# Altium PCB QKD-LD-002.PcbDoc
Units mm, origin at the board's own origin, x right, y up, seen from the top; angles counter-clockwise.
Board outline 56.64 x 46.48 mm, 4 copper layers (Top Layer 1, GND, 5V0, Bottom Layer 1), stack 1.527 mm thick; 43 components, 26 nets, 130 pads, 340 vias.
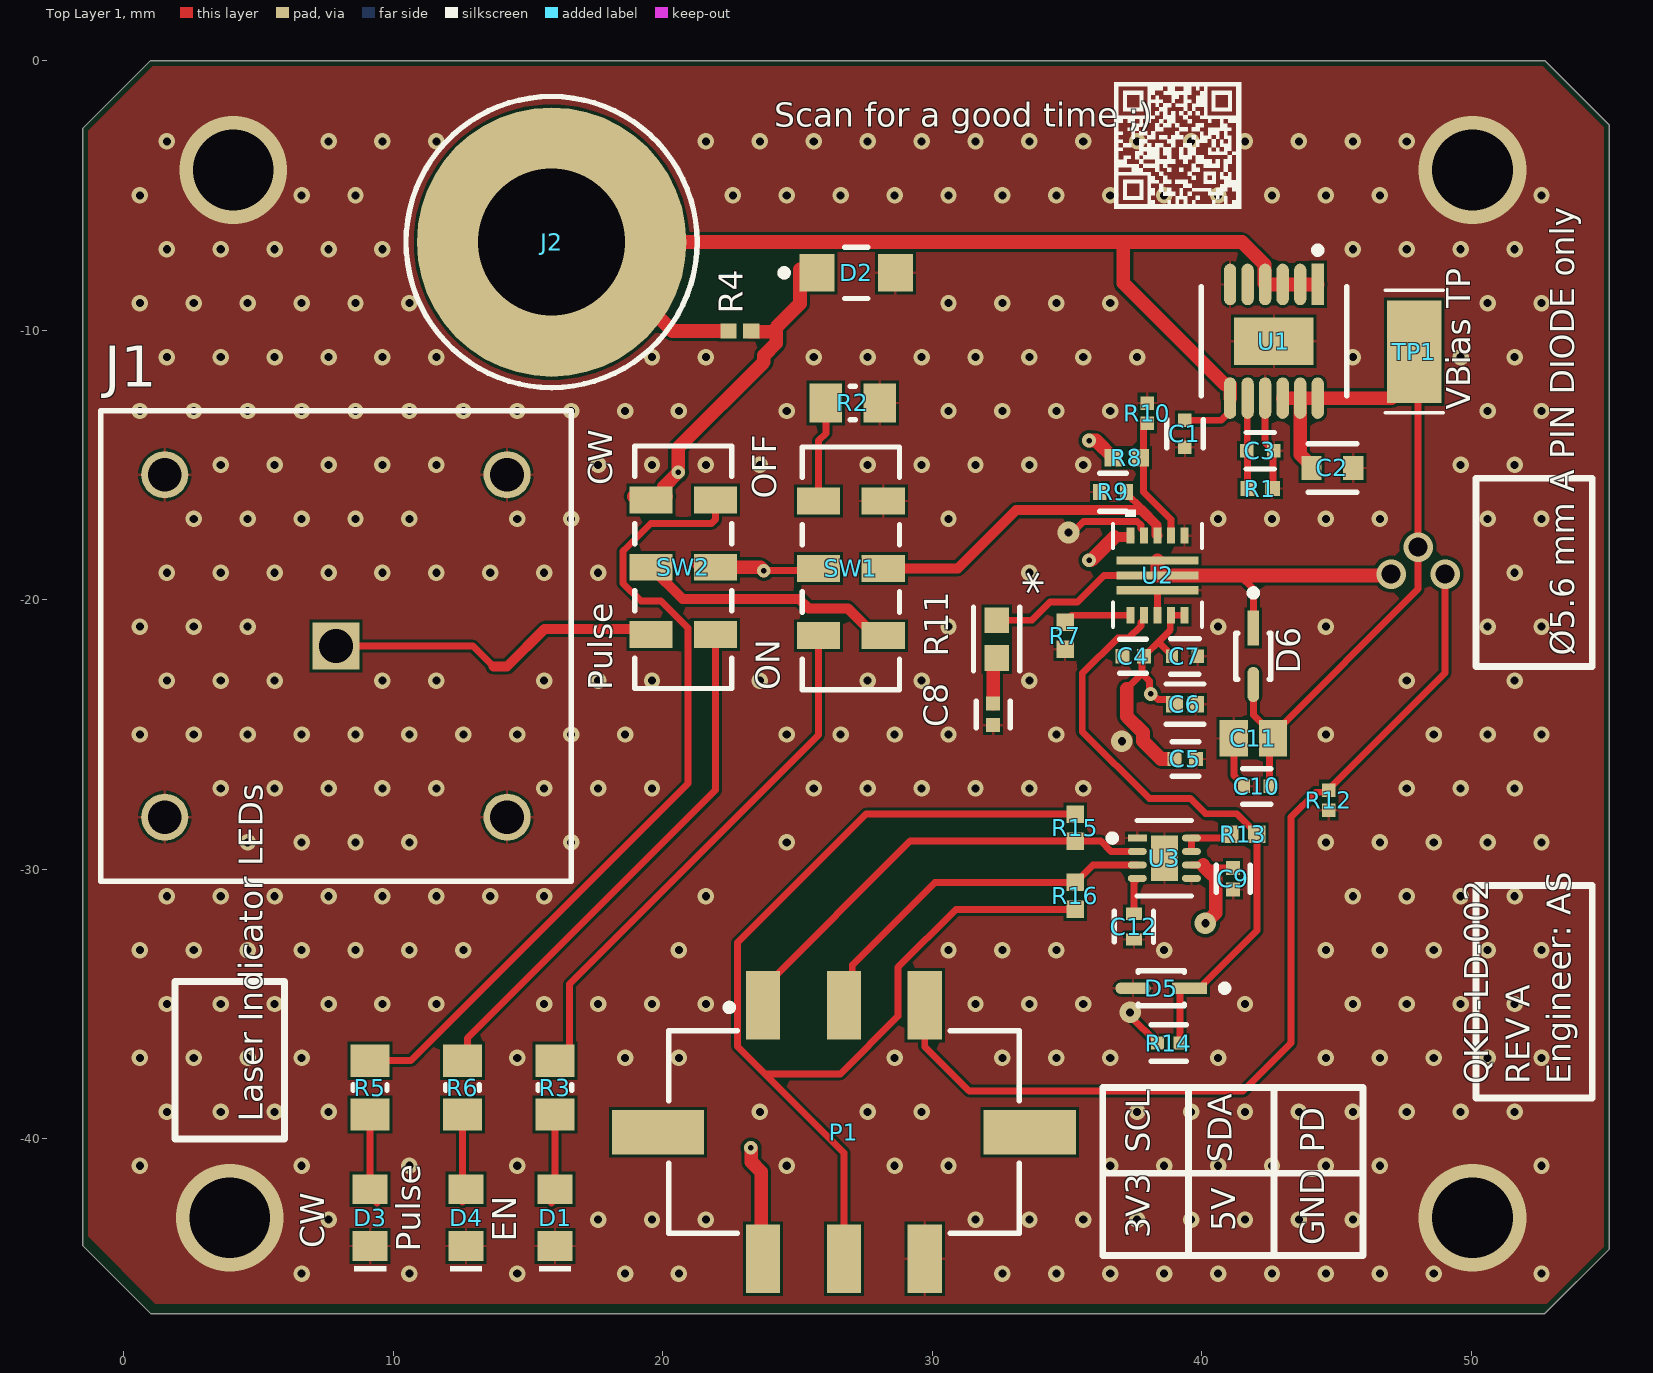
[diagram p0: Top Layer 1 view]
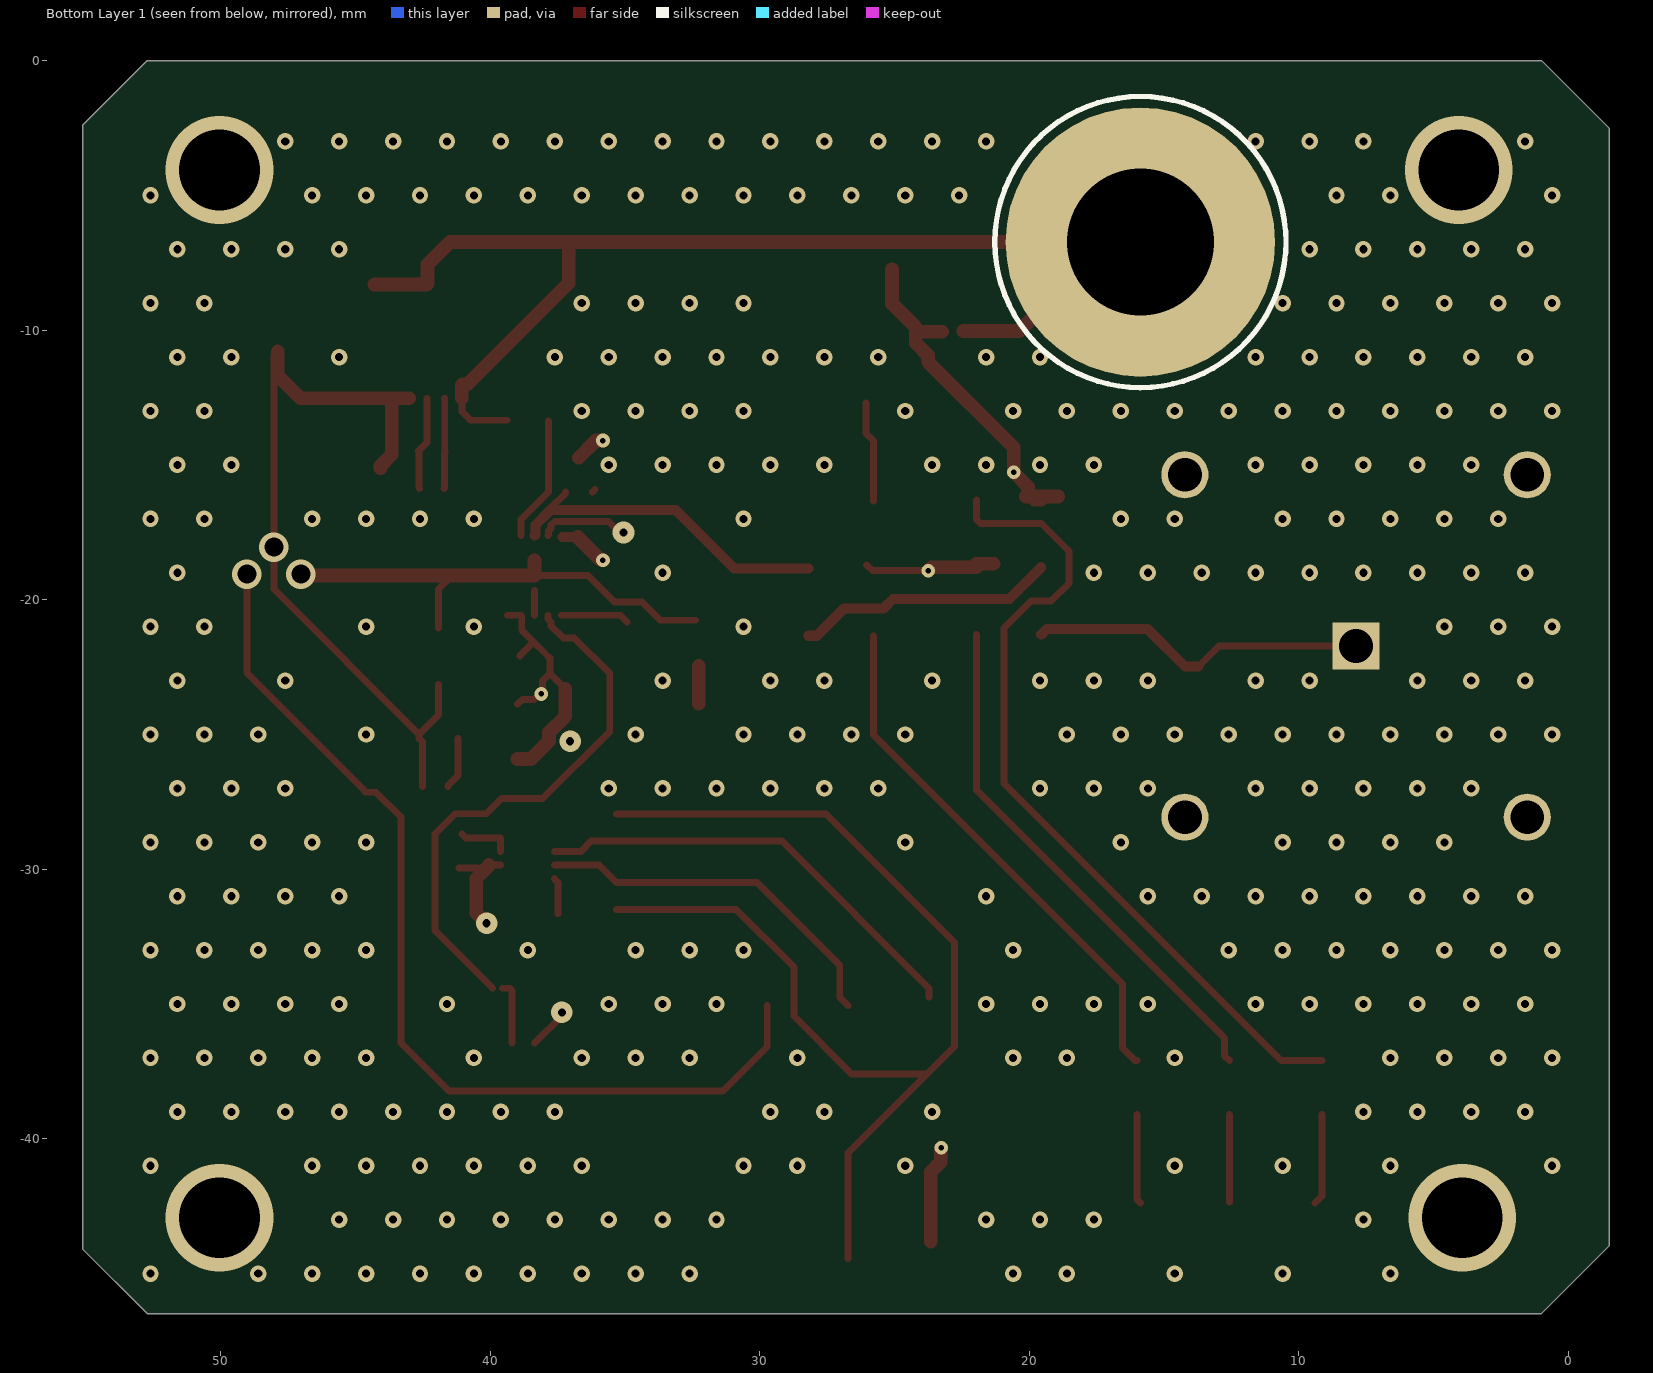
[diagram p1: Bottom Layer 1 view, seen from below]
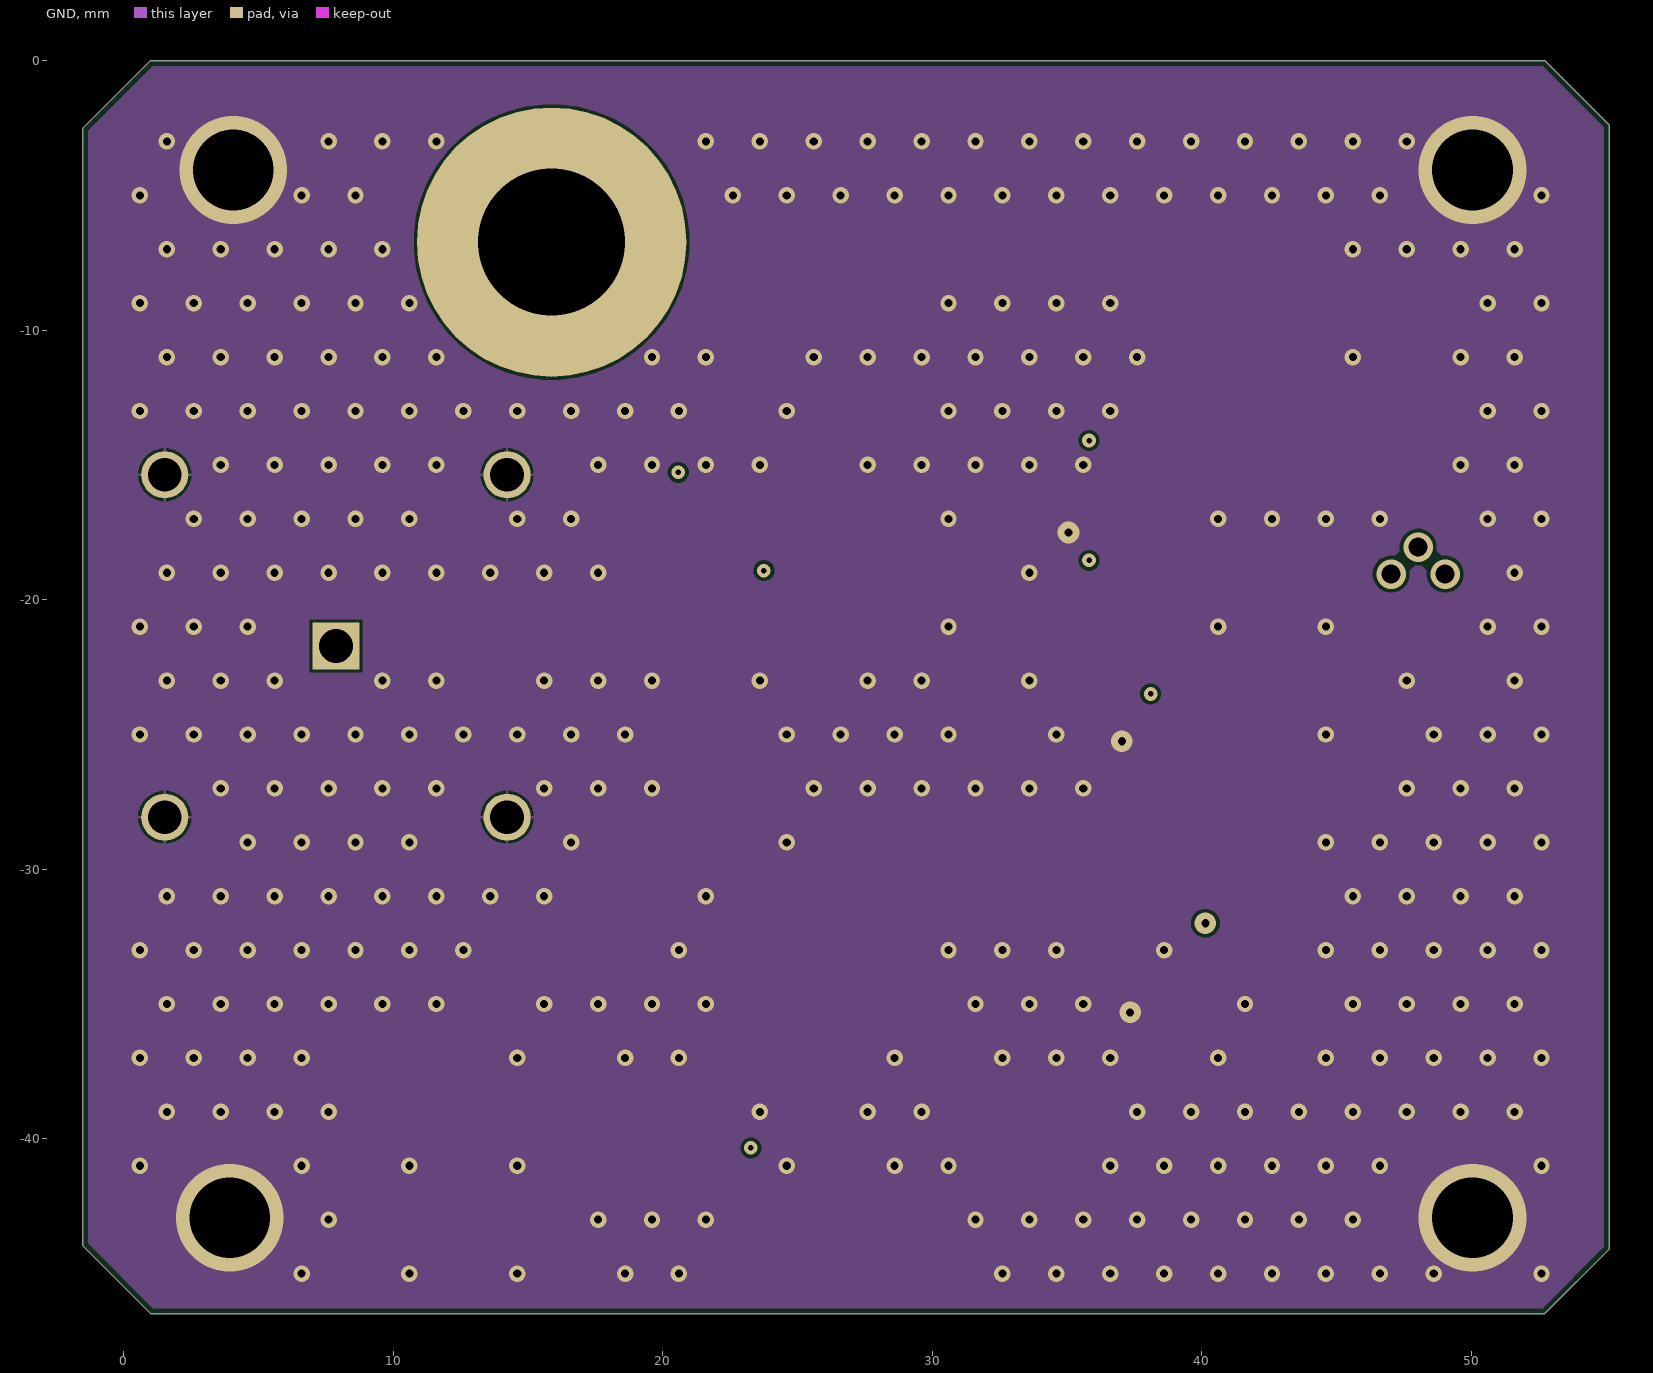
[diagram p2: GND]
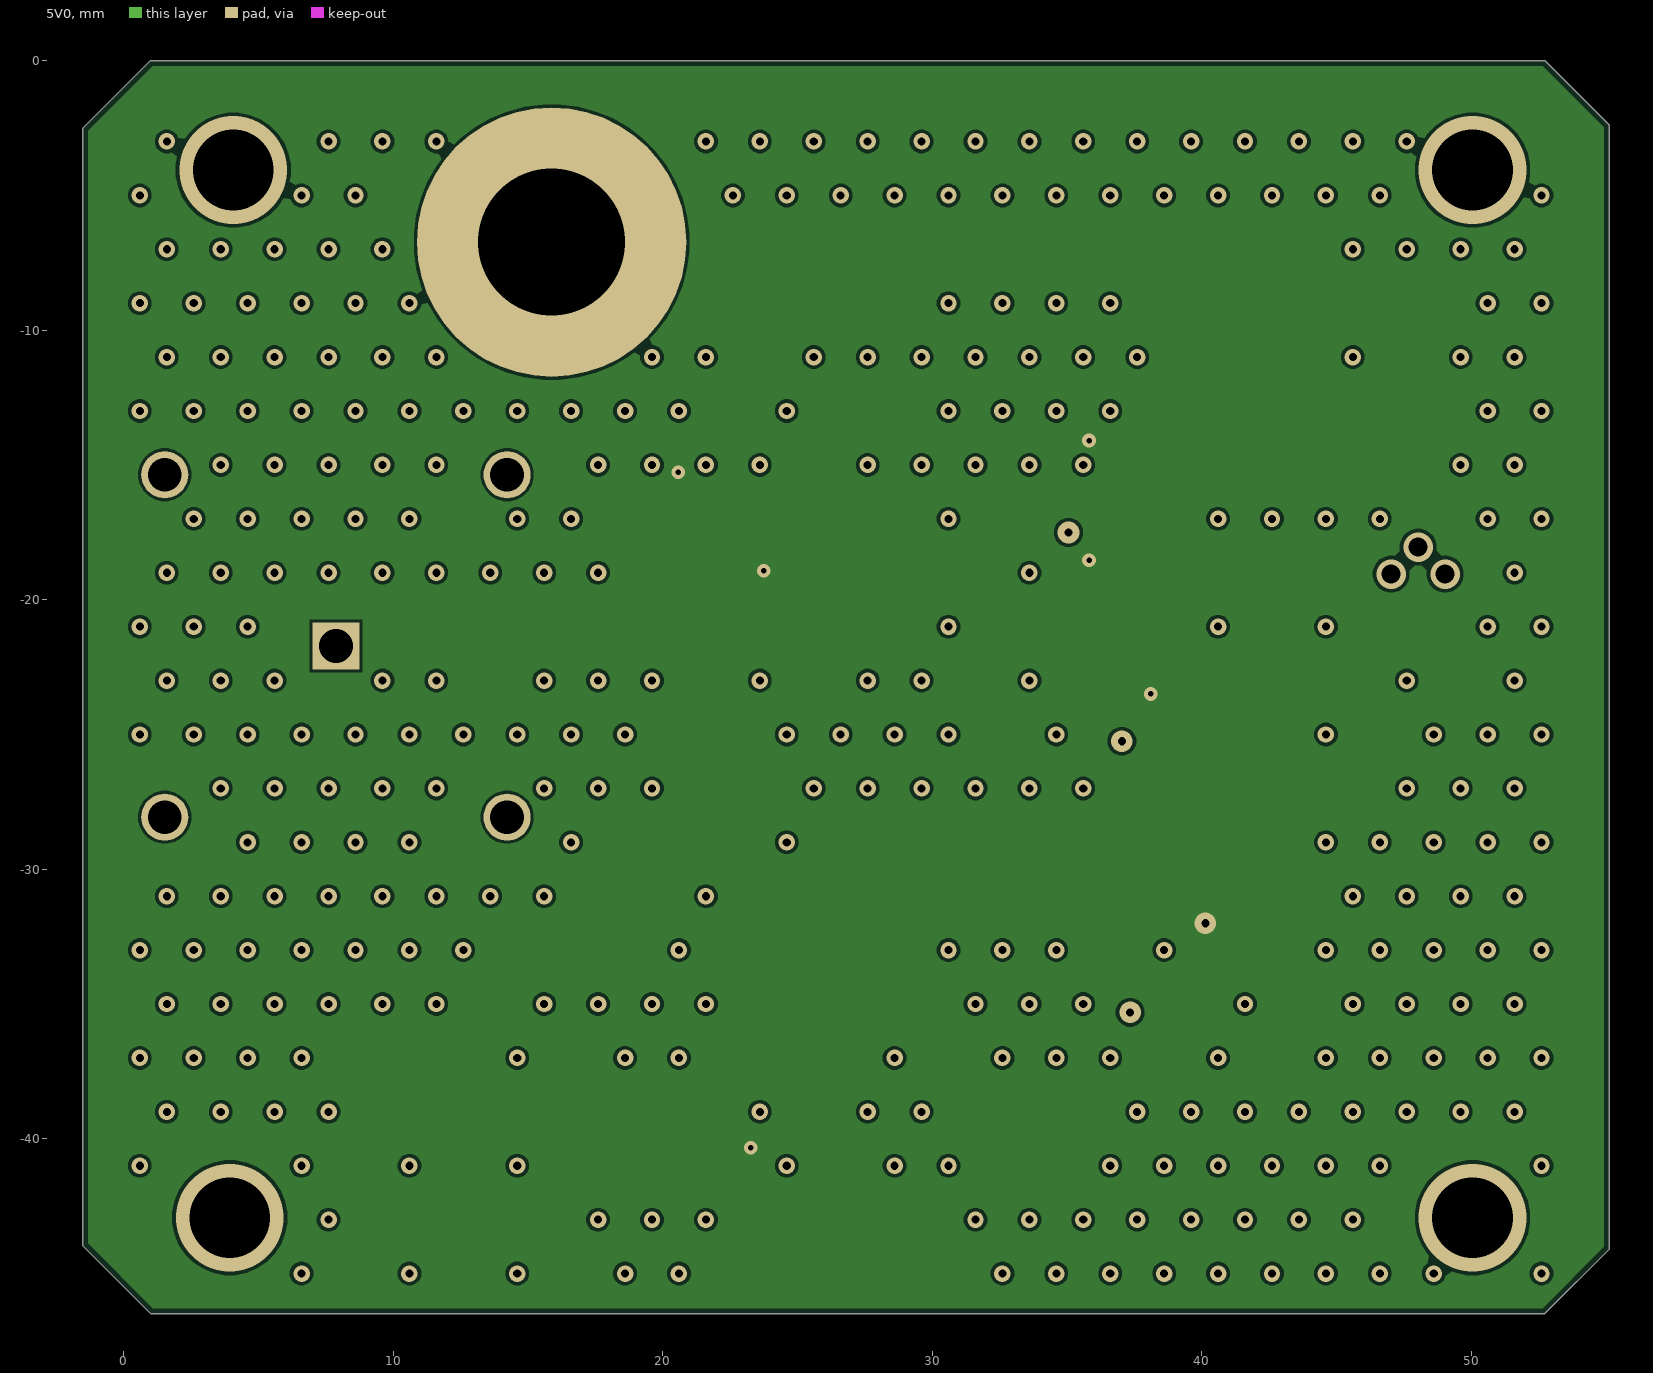
[diagram p3: 5V0]
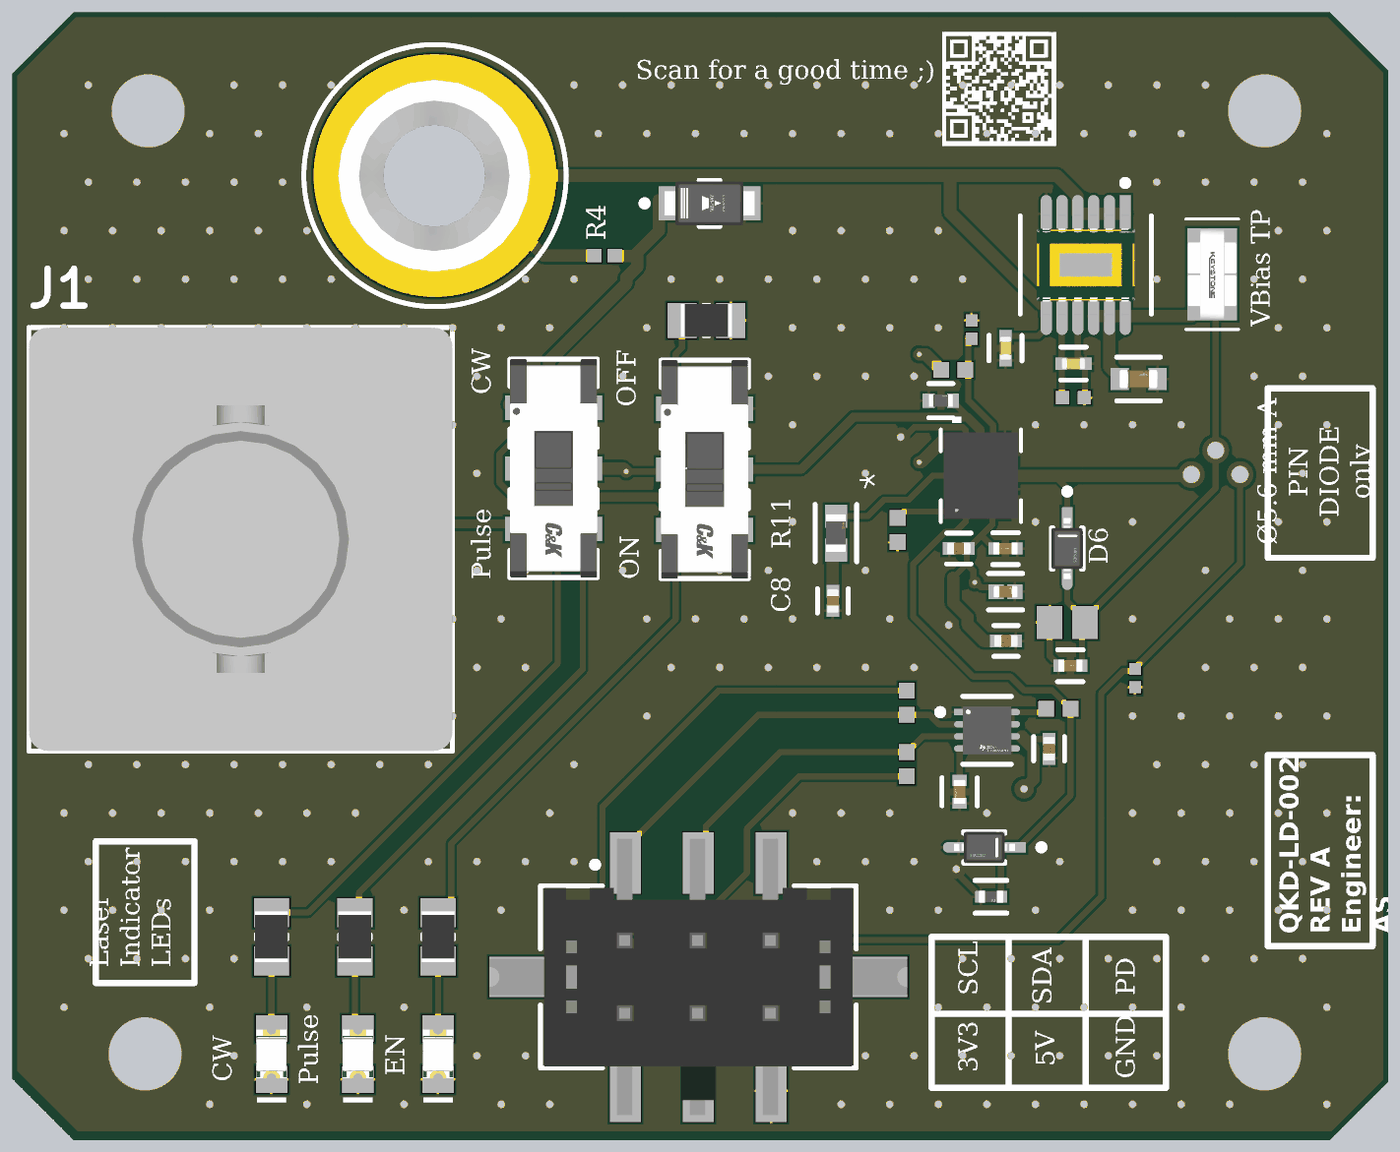
[diagram p4: 3D render of the assembled board from above, using the file's embedded part models]

## Layer stack, top to bottom
Top Solder: solder mask 0.0102, Solder Resist, Dk 3.5
Top Layer 1: signal copper 0.0175
Dielectric 2: prepreg 0.196, PP-006, Dk 4.1
GND: signal copper 0.035
Dielectric 1: dielectric 1.03, FR-4, Dk 4.8
5V0: signal copper 0.035
Dielectric 3: prepreg 0.196, PP-006, Dk 4.1
Bottom Layer 1: signal copper 0.0175
Bottom Solder: solder mask 0.0102, Solder Resist, Dk 3.5

## Board outline
-1.524,-43.958 -1.524,-2.524 1,0 52.721,0 55.118,-2.397 55.118,-44.085 52.721,-46.482 1,-46.482

## Design rules (kind name [scope] priority, off if disabled: settings)
BoardOutlineClearance [All] p1: gap=0.2 ignorepadtopadclearanceinfootprint=FALSE
Clearance [All] p1: gap=0.102 ignorepadtopadclearanceinfootprint=TRUE except(0.127: Arc-Via Track-Via SMDPad-Via THPad-Via Via-Via Via-Fill Via-Poly Via-Region Via-Text; 0.254: Arc-Hole Track-Hole SMDPad-Hole THPad-Hole Via-Hole Fill-Hole Poly-Hole Region-Hole Text-Hole)
ComponentClearance [All] p1: gap=0.102 collisioncheckmode=3 verticalgap=0.102 showdistances=TRUE
DiffPairsRouting [All] p1: maxlimit=0.102 minlimit=0.102 mostfreqgap=0.102 toplayer_minwidth=0.102 toplayer_maxwidth=1816.048 toplayer_prefwidth=0.102 midlayer1_minwidth=0.102 midlayer1_maxwidth=1816.048 midlayer1_prefwidth=0.102 midlayer2_minwidth=0.102 midlayer2_maxwidth=1816.048 midlayer2_prefwidth=0.102 bottomlayer_minwidth=0.102 bottomlayer_maxwidth=1816.048 bottomlayer_prefwidth=0.102 maxuncoupledlength=12.7
Height [All] p1: minheight=0 maxheight=1816.048 prefheight=12.7
HoleSize [All] p1: absolutevalues=TRUE maxlimit=6.3 minlimit=0.2 maxpercent=80.000 minpercent=20.000
HoleToHoleClearance [All] p1: gap=0.254 allowstackedmicrovias=FALSE
MinimumAnnularRing [All] p1: minimumring=0.152
MinimumSolderMaskSliver [All] p1: minsoldermaskwidth=0.152
NetAntennae NetAntennae_1 [Not (InNet('PD READ') Or InNet('IOUT') Or InNet('VBIAS'))] p1: netantennaetolerance=0
PlaneClearance [All] p1: clearance=0.102
PlaneConnect PlaneConnectPowerPads [InPadClass('PowerPads')] p1: planeconnectstyle=Direct reliefexpansion=0.508 reliefentries=4 reliefconductorwidth=0.254 reliefairgap=0.254
PlaneConnect [InNet('+5V0')] p2: pad.planeconnectstyle=Relief pad.reliefexpansion=0.3 pad.reliefentries=4 pad.reliefconductorwidth=0.102 pad.reliefairgap=0.102 via.planeconnectstyle=Direct via.reliefexpansion=0.3 via.reliefentries=4 via.reliefconductorwidth=0.127 via.reliefairgap=0.127
PlaneConnect PlaneConnect_1 [All] p3: pad.planeconnectstyle=Relief pad.reliefexpansion=0.3 pad.reliefentries=4 pad.reliefconductorwidth=0.102 pad.reliefairgap=0.102 via.planeconnectstyle=Direct via.reliefexpansion=0.3 via.reliefentries=4 via.reliefconductorwidth=0.127 via.reliefairgap=0.127
PolygonConnect PolygonConnectPowerPads [All vs (InPadClass('PowerPads'))] p1: connectstyle=Direct reliefconductorwidth=0.254 reliefentries=4 polygonreliefangle="90 Angle" airgapwidth=0.254
PolygonConnect [All] p2: thpad.connectstyle=Relief thpad.reliefconductorwidth=0.102 thpad.reliefentries=4 thpad.polygonreliefangle="90 Angle" thpad.airgapwidth=0.102 smdpad.connectstyle=Relief smdpad.reliefconductorwidth=0.102 smdpad.reliefentries=4 smdpad.polygonreliefangle="90 Angle" smdpad.airgapwidth=0.102 via.connectstyle=Direct via.reliefconductorwidth=0.127 via.reliefentries=4 via.polygonreliefangle="90 Angle" via.airgapwidth=0.127
RoutingVias [All] p1: holewidth=0.2 width=0.45 viastyle="Through Hole" minholewidth=0.2 minwidth=0.45 maxholewidth=6.3 maxwidth=6.55
SilkToSilkClearance [All] p1: silktosilkclearance=0.127
SilkToSolderMaskClearance [IsPad] p1: minsilkscreentomaskgap=0.127 clearancetoexposedcopper=TRUE
SolderMaskExpansion [All] p1: expansion=0.051 istentingtop=FALSE
SupplyNets "Schematic Supply Nets_1" [InNet('GND')] p1: voltage=0.000
SupplyNets "Schematic Supply Nets" [InNet('VBIAS')] p2: voltage=0.000
UnRoutedNet [Not InComponent('J2') and Not (IsVia)] p1: checkbadconnections=TRUE
Width Width_10mil [All] p1: maxlimit=25.4 minlimit=0.254 preferedwidth=0.254 minimp=50.000000 maximp=50.000000 favimp=50.000000
Width Width_6mil [All] p2: maxlimit=25.4 minlimit=0.152 preferedwidth=0.152 minimp=50.000000 maximp=50.000000 favimp=50.000000
Width Power_20mil [InNet('+5V0')] p3: maxlimit=25.4 minlimit=0.508 preferedwidth=0.508 minimp=50.000000 maximp=50.000000 favimp=50.000000
Width Power_20mil_1 [InNet('GND')] p4: maxlimit=25.4 minlimit=0.508 preferedwidth=0.508 minimp=50.000000 maximp=50.000000 favimp=50.000000
Width Power_12mil [InNet('IOUT')] p5: maxlimit=25.4 minlimit=0.305 preferedwidth=0.305 minimp=50.000000 maximp=50.000000 favimp=50.000000
Width Width_4mil [All] p6: maxlimit=25.4 minlimit=0.102 preferedwidth=0.102 minimp=50.000000 maximp=50.000000 favimp=50.000000
18 further rules are at their usual default settings.

## Classes and differential pairs
component class "Power Regulation and Interfaces": C1 C2 C3 D1 D2 D3 D4 J1 J2 P1 R1 R2 R3 R4 R5 R6 SW1 SW2 TP1 U1
component class "Laser Driver": C4 C5 C6 C7 C8 C9 C10 C11 C12 D5 D6 R7 R8 R9 R10 R11 R12 R13 R14 R15 R16 U2 U3

## Components (designator, comment, footprint, x,y, rotation, side; value= is the part's Value field where it differs from the comment)
C1 "4.7u" FP-CC0402-MFG 39.37,-13.843 r270 top value="4.7 uF"
C2 "47 uF" FP-GRM188-0_2-MFG 44.844,-15.113 r0 top
C3 "4.7u" FP-CC0402-MFG 42.164,-14.478 r180 top value="4.7 uF"
C4 "100nF" FP-C0402-BB-MFG 37.446,-22.098 r0 top value="0.10 μF"
C5 "100nF" FP-C0402-BB-MFG 39.389,-25.908 r180 top value="0.10 μF"
C6 "10 uF" FP-GRM155-0_2-IPC_C 39.37,-23.876 r0 top
C7 "1uF" FP-0402-L_1_0_0_05-W_0_5-MFG 39.37,-22.098 r0 top
C8 "100 pF" FP-C0402-BB-MFG 32.258,-24.257 r270 top
C9 "100nF" FP-C0402-BB-MFG 41.161,-30.349 r270 top value="0.10 μF"
C10 "1uF" FP-0402-L_1_0_0_05-W_0_5-MFG 42.037,-26.924 r0 top
C11 "100nF" CAPC2013X145X50LL20T20 41.91,-25.146 r0 top
C12 "2.2u" FP-GRM155-0_15-MFG 37.478,-32.127 r270 top
D1 "LASER ON" WL-SMCW_0805_150080xx75000 16.002,-42.926 r90 top
D2 "BZD27C5V6P-E3-08" FP-S8-V-3915_01-001-MFG 27.178,-7.874 r180 top
D3 "CW" WL-SMCW_0805_150080xx75000 9.144,-42.926 r90 top
D4 "PULSE" WL-SMCW_0805_150080xx75000 12.7,-42.926 r90 top
D5 "2.4V" FP-SOD323-IPC_B 38.494,-34.413 r180 top
D6 "D22V0S1U2WS-7" FP-SOD323-IPC_B 41.91,-22.098 r270 top
J1 "5227699-2" TECO-5227699-2_V 7.874,-21.717 r0 top
J2 "575-4" KSTN-575-4 15.875,-6.731 r0 top
P1 "662006231822" 662006231822 26.718,-39.752 r180 top
R1 "49.9k" RESC1005X40X25NL05T05 42.164,-15.875 r180 top
R2 "1k" RESC2013X60X35ML10T20 27.051,-12.7 r0 top
R3 "1k" RESC2013X60X35ML10T20 16.002,-38.1 r270 top
R4 "0" RESC1005X40X25NL05T10 22.86,-10.033 r0 top
R5 "1k" RESC2013X60X35ML10T20 9.144,-38.1 r270 top
R6 "1k" RESC2013X60X35ML10T20 12.573,-38.1 r270 top
R7 "20k" RESC1005X40X25ML05T05 34.925,-21.336 r90 top
R8 "20k" RESC1005X40X25ML05T05 37.211,-14.732 r180 top
R9 "50" FP-RT0402-0_35-MFG 36.703,-16.002 r0 top
R10 "10k" RESC1005X40X25LL10T10 37.973,-13.081 r270 top
R11 "10" FP-TFCR0603-IPC_B 32.385,-21.463 r270 top
R12 "10k" RESC1005X40X25LL10T10 44.704,-27.438 r90 top
R13 "20k" RESC1005X40X25ML05T05 41.542,-28.698 r0 top
R14 "1.8k" FP-RN73R1E-IPC_C 38.768,-36.449 r0 top
R15 "20k" RESC1005X40X25ML05T05 35.306,-28.456 r90 top
R16 "20k" RESC1005X40X25ML05T05 35.306,-30.988 r270 top
SW1 "JS202011JCQN" FP-JS202011JCQN-MFG 26.981,-18.836 r270 top
SW2 "JS202011JCQN" FP-JS202011JCQN-MFG 20.758,-18.796 r270 top
TP1 "5019" 5019_MFG 47.879,-10.795 r270 top
U1 "LT3045EMSE#TRPBF" FP-MSE-12-05-08-1666-IPC_B 42.672,-10.414 r270 top
U2 "LMH13000RQER" XLMH13000RQER.A_WQFN-HR_TXI_TEX 38.354,-19.099 r90 top
U3 "DAC53701DSGR" FP-DSG0008A-IPC_B 38.608,-29.591 r0 top

## Footprints (in the part's own frame and the unit in brackets; to place one, negate y for a bottom-side part, rotate by r counter-clockwise, add the part's x,y. Pads: shape width x height; smd on the part's side, far side on the other; paste and mask are expansions set on the pad)
5019_MFG [mm] "Recommended Land Pattern"
  rect 3.8x2.03 smd paste+0 mask+0: 1(0,0)
  silkscreen extent -2.27,-1.08 2.27,1.08, body extent -1.91,-1.01 1.91,1.01, height 2.42
662006231822 [mm] "3.00mm SMT Male Dual Row Vertical Header with SMT Solder Tab, 6p"
  rect 1.27x2.54 smd: 1(3,-4.7) 2(0,-4.7) 3(-3,-4.7) 4(3,4.7) 5(0,4.7) 6(-3,4.7)
  rect 3.43x1.65 smd: MP1(-6.895,0) MP2(6.895,0)
  silkscreen extent -6.5,-4.75 6.5,3.76, body extent -8.6,-5.7 8.6,5.7, height 9.93
CAPC2013X145X50LL20T20 [mm] "Chip Capacitor, 2-Leads, Body 2.00x1.25mm, IPC High Density"
  rect 1.05x1.35 smd: 1(-0.725,0) 2(0.725,0)
  body extent -1.1,-0.72 1.1,0.72, height 1.45
FP-0402-L_1_0_0_05-W_0_5-MFG [mm]
  rect 0.45x0.5 smd paste+0 mask+0: 1(-0.475,0) 2(0.475,0)
  silkscreen extent -0.53,-0.66 0.53,0.65, body extent -0.8,-0.38 0.8,0.38, height 0.25
FP-C0402-BB-MFG [mm]
  rect 0.52x0.52 smd paste+0 mask+0: 1(-0.4,0) 2(0.4,0)
  silkscreen extent -0.5,-0.64 0.5,0.64, body extent -0.8,-0.4 0.8,0.4, height 0.25
FP-CC0402-MFG [mm]
  rect 0.5x0.5 smd paste+0 mask+0: 1(-0.5,0) 2(0.5,0)
  silkscreen extent -0.53,-0.68 0.53,0.67, body extent -0.87,-0.48 0.87,0.48, height 0.25
FP-DSG0008A-IPC_B [mm]
  rect 0.706x0.257 smd paste+0 mask+0: 1(-1.003,0.75)
  rrect100% 0.706x0.257 smd paste+0 mask+0: 2(-1.003,0.25) 3(-1.003,-0.25) 4(-1.003,-0.75) 5(1.003,-0.75) 6(1.003,-0.25) 7(1.003,0.25) 8(1.003,0.75)
  rect 1x1.7 smd paste-1000 mask+0: 9(0,0)
  silkscreen extent -2.06,-1.4 1,1.4, body extent -1.61,-1.25 1.61,1.25, height 0.25
FP-GRM155-0_2-IPC_C [mm]
  rect 0.628x0.606 smd paste+0 mask+0: 1(-0.389,0) 2(0.389,0)
  silkscreen extent -0.7,-0.75 0.7,0.75, body extent -0.8,-0.45 0.8,0.45, height 0.25
FP-GRM155-0_15-MFG [mm]
  rect 0.45x0.6 smd paste+0 mask+0: 1(-0.475,0) 2(0.475,0)
  silkscreen extent -0.58,-0.73 0.57,0.73, body extent -0.8,-0.43 0.8,0.43, height 0.25
FP-GRM188-0_2-MFG [mm]
  rect 0.75x0.9 smd paste+0 mask+0: 1(-0.775,0) 2(0.775,0)
  silkscreen extent -0.9,-0.9 0.9,0.9, body extent -1.25,-0.6 1.25,0.6, height 0.25
FP-JS202011JCQN-MFG [mm]
  rect 1x1.6 smd paste+0 mask+0: 1(-2.5,-1.2) 2(0,-1.2) 3(2.5,-1.2) 5(-2.5,1.2) 6(0,1.2) 7(2.5,1.2)
  silkscreen extent -4.5,-1.8 4.5,1.8, body extent -4.6,-2.1 4.6,2.1, height 0.25
FP-MSE-12-05-08-1666-IPC_B [mm]
  rect 1.54x0.455 smd paste+0 mask+0: 1(-2.11,1.625)
  rrect100% 1.54x0.455 smd paste+0 mask+0: 2(-2.11,0.975) 3(-2.11,0.325) 4(-2.11,-0.325) 5(-2.11,-0.975) 6(-2.11,-1.625) 7(2.11,-1.625) 8(2.11,-0.975) 9(2.11,-0.325) 10(2.11,0.325) 11(2.11,0.975) 12(2.11,1.625)
  rect 1.753x2.947 smd paste-1000 mask+0: 13(0,0)
  silkscreen extent -3.5,-2.7 2.02,2.7, body extent -3.13,-2.27 3.13,2.27, height 0.25
FP-RN73R1E-IPC_C [mm]
  rect 0.488x0.472 smd paste+0 mask+0: 1(-0.414,0) 2(0.414,0)
  silkscreen extent -0.66,-0.67 0.66,0.67, body extent -0.76,-0.38 0.76,0.38, height 0.25
FP-RT0402-0_35-MFG [mm]
  rect 0.5x0.6 smd paste+0 mask+0: 1(-0.5,0) 2(0.5,0)
  silkscreen extent -0.5,-0.71 0.5,0.7, body extent -0.85,-0.4 0.85,0.4, height 0.25
FP-S8-V-3915_01-001-MFG [mm]
  rect 1.3x1.4 smd paste+0 mask+0: 1(-1.45,0) 2(1.45,0)
  silkscreen extent -0.42,-0.95 2.8,0.95, body extent -2.2,-1.05 2.2,1.05, height 0.25
FP-SOD323-IPC_B [mm]
  rect 1.306x0.432 smd paste+0 mask+0: 1(-1.05,0)
  rrect100% 1.306x0.432 smd paste+0 mask+0: 2(1.05,0)
  silkscreen extent -2.48,-0.65 0.85,0.65, body extent -1.95,-0.9 1.95,0.9, height 0.25
FP-TFCR0603-IPC_B [mm]
  rect 0.958x0.912 smd paste+0 mask+0: 1(-0.702,0) 2(0.702,0)
  silkscreen extent -1.18,-0.86 1.18,0.86, body extent -1.43,-0.71 1.43,0.71, height 0.25
KSTN-575-4 [mm] "Banana Jack, Non-Insulated, Dia 7.92mm"
  round 10 hole 5.45: 1(0,0)
  silkscreen extent -5.4,-5.4 5.4,5.4, body extent -3.98,-3.96 3.92,3.94, height 2.36
RESC1005X40X25LL10T10 [mm] "Chip Resistor, 2-Leads, Body 1.00x0.50mm, IPC High Density"
  rect 0.5x0.5 smd: 1(-0.375,0) 2(0.375,0)
  body extent -0.55,-0.3 0.55,0.3, height 0.4
RESC1005X40X25ML05T05 [mm] "Chip Resistor, 2-Leads, Body 1.00x0.50mm, IPC Low Density"
  rect 0.65x0.65 smd: 1(-0.5,0) 2(0.5,0)
  body extent -0.53,-0.27 0.53,0.28, height 0.4
RESC1005X40X25NL05T05 [mm] "Chip Resistor, 2-Leads, Body 1.00x0.50mm, IPC Medium Density"
  rect 0.55x0.55 smd: 1(-0.45,0) 2(0.45,0)
  body extent -0.53,-0.27 0.53,0.28, height 0.4
RESC1005X40X25NL05T10 [mm] "Chip Resistor, 2-Leads, Body 1.00x0.50mm, IPC Medium Density"
  rect 0.6x0.55 smd: 1(-0.425,0) 2(0.425,0)
  body extent -0.53,-0.27 0.53,0.28, height 0.4
RESC2013X60X35ML10T20 [mm] "Chip Resistor, 2-Leads, Body 2.1x1.35mm, IPC Low Density"
  rect 1.2x1.45 smd: 1(-1,0) 2(1,0)
  silkscreen extent -0.1,-0.62 0.1,0.62, body extent -1.05,-0.68 1.05,0.67, height 0.6
TECO-5227699-2_V [mm] "THD, 5-Leads, Body 17.45x17.45mm"
  rect 1.75x1.75 hole 1.25: 1(0,0)
  round 1.75 hole 1.25: 2(-6.35,6.35) 3(-6.35,-6.35) 4(6.35,-6.35) 5(6.35,6.35)
  silkscreen extent -8.72,-8.72 8.73,8.73, body extent -8.72,-8.72 8.73,8.73, height 18.38
WL-SMCW_0805_150080xx75000 [mm] "SMD Mono-color Chip LED, body 2.0x1.25mm"
  rect 1.1x1.3 smd: 1(-1.05,0) 2(1.05,0)
  silkscreen extent -2,-0.6 -1.8,0.6, body extent -1,-0.63 1,0.62, height 0.7
XLMH13000RQER.A_WQFN-HR_TXI_TEX [mm]
  rect 0.6x0.305 smd paste+0 mask+0: 1(-1.475,1) 2(-1.475,0.5) 3(-1.475,0) 4(-1.475,-0.5) 5(-1.475,-1) 9(1.475,-1) 10(1.475,-0.5) 11(1.475,0) 12(1.475,0.5) 13(1.475,1)
  rect 0.305x3.048 smd paste+0 mask+0: 6(-0.55,0) 7(0,0) 8(0.55,0)
  silkscreen extent -1.91,-1.65 2.44,1.65, body extent -1.78,-1.52 1.78,1.52, height 0.81

## Part data
C1 C3: library part CMP-03422-001389-1, "CAP CER 4.7UF 6.3V X5R 0402", Capacitance="4.7 uF", Manufacturer=YAGEO, Manufacturer Part Number=CC0402KRX5R5BB475, Package=CC0402, Temperature="-55°C to +125°C", Temperature Characteristic=X5R, Temperature Coefficient=30ppm/°C, Temperature Range High=+125°C, Temperature Range Low=-55°C, Tolerance=0.1, Voltage Rating="6.3 V", Automotive=No, Automotive Grade=NA, Category=Cap, ComponentLink2Description=Datasheet, ComponentLink2URL=http://www.yageo.com/documents/recent/UPY-GP_NP0_16V-to-50V_16.pdf, Device Class L1="Passive Components", Device Class L2=Capacitors, Device Class L3="Ceramic Capacitors", Digikey Description="CAP CER 4.7UF 6.3V X5R 0402", Footprint Url=http://www.yageo.com/exep/pages/download/literatures/UPY-C_GEN_24.pdf, Height=0.55mm, Ipc Land Pattern Name=CAPC10050X50, Lead Free=Yes, Material=Ceramic, Mouser Description="0402 4.7 uF 6.3 V ±10% Tolerance X5R SMT Multilayer Ceramic Capacitor", Octopart=https://octopart.com/cc0402krx5r5bb475-yageo-71498076, RoHS=TRUE
C2: library part CMP-06035-023005-1, "Chip Multilayer Ceramic Capacitors for General Purpose, 0603, 47uF, X5R, 15%, 20%, 6.3V"
C4 C5 C9: library part CMP-1034-02069-4, "CAP CER 0.1UF 16V 10% X5R 0402", Capacitance="0.10 μF", Manufacturer=Kemet, Manufacturer Part Number=C0402C104K4PACTU, Package=C0402-BB, Temperature="-55°C to +125°C", Temperature Characteristic=X5R, Temperature Coefficient=15%, Temperature Range High=+125°C, Temperature Range Low=-55°C, Tolerance=0.1, Voltage Rating="16 V", Automotive=No, Category=Cap, ComponentLink2Description=Datasheet, ComponentLink2URL=https://content.kemet.com/datasheets/KEM_C1002_X7R_SMD.pdf, Device Class L1="Passive Components", Device Class L2=Capacitors, Device Class L3="Ceramic Capacitors", Digikey Description="CAP CER 0.1UF 16V 10% X5R 0402", Height=0.55mm, Ipc Land Pattern Name=CAPC10050X50, Lead Free=Yes, Material=Ceramic, Mouser Description="Multilayer Ceramic Capacitors MLCC - SMD/SMT 16volts 0.1uF 10% X5R", Octopart=https://octopart.com/c0402c104k4pactu-kemet-8375715, RoHS=TRUE
C6: library part CMP-06035-053439-1, "Chip Multilayer Ceramic Capacitors for General Purpose, 0402, 10uF, X5R, 15%, 20%, 10V"
C7 C10: library part CMP-14477-003599-2, "None", RoHS Compliant=Yes
C8: library part CMP-03020-017256-1, "C0402 100 pF U2J 2.00% 10 V", Manufacturer=Kemet, Manufacturer Part Number=C0402C101G8JACAUTO, Package=C0402-BB, Temperature="-55°C to +125°C", Temperature Characteristic=U2J, Temperature Coefficient=15%, Temperature Range High=+125°C, Temperature Range Low=-55°C, Tolerance=0.02, Voltage Rating="10 V", Automotive=No, Capacitance="100 pF", Category=Cap, ComponentLink2Description=Datasheet, ComponentLink2URL=https://content.kemet.com/datasheets/KEM_C1002_X7R_SMD.pdf, Device Class L1="Passive Components", Device Class L2=Capacitors, Device Class L3="Ceramic Capacitors", Height=0.55mm, Ipc Land Pattern Name=CAPC10050X50, Lead Free=Yes, Material=Ceramic, Octopart=https://octopart.com/c0402c101g8jacauto-kemet-84730079, RoHS=TRUE
C11: library part CMP-2007-01396-1, Manufacturer=Vitramon, Part Number=VJ0805Y104JXXPW1BC
C12: library part CMP-06035-015498-1, "Chip Multilayer Ceramic Capacitors for General Purpose, 0402, 2.2uF, X7T, +22%/-33%, 20%, 16V"
D1: library part CMP-1426-00011-5, "LED Uni-Color Red 630nm 2-Pin Chip 0805(2012Metric) T/R", Case Code (Imperial)=0805, Case Code (Metric)=2012, Color=Red, Forward Current=100mA, Forward Voltage=2V, Manufacturer Lifecycle Status=ACTIVE, Manufacturer Package Identifier="0805 (2012 metric)", Max Junction Temperature (Tj)=95°C, Max Operating Temperature=85°C, Max Reverse Voltage (DC)=5V, Min Operating Temperature=-40°C, Power Dissipation=72mW, Test Current=20mA, Case/Package=0805, Dominant Wavelength=625nm, Height=700µm, Length=2mm, Lens Style="Clear, Rectangular", Lifecycle Status=Production, Luminous Intensity=150mcd, Mount="Surface Mount", Packaging="Tape and Reel", Peak Wavelength=630nm, REACH SVHC=Unknown, RoHS=Compliant, Viewing Angle=140°, Wavelength=625nm, Width=1.25mm, YEOL="1 = Estimated lifetime > 10 years"
D2: library part CMP-02541-000005-1, "DIODE ZENER 5.6V 800MW DO219AB", Forward Current=0.2A, Manufacturer=Vishay, Max Junction Temp=+175°C, Max Reverse Leakage Current=10uA, Max Zener Voltage=6V, Nom Zener Voltage=5.6V, Package=S8-V-3915.01-001, Power Dissipation=800mW, Reverse Voltage=2V, Temperature="-65°C to +175°C", Temperature Range Low=-65°C, Automotive=No, Automotive Grade=NA, Category=Diode, ComponentLink2Description=Datasheet, ComponentLink2URL=http://www.vishay.com/docs/85153/bzd27series.pdf, Device Class L1="Discrete Semiconductors", Device Class L2=Diodes, Device Class L3="Zener Diodes", Digikey Description="DIODE ZENER 5.6V 800MW DO219AB", Height=1.08mm, Lead Free=Yes, Manufacturer Part Number=BZD27C5V6P-E3-08, Mouser Description="Diode Zener Single 5.6V 800mW 2-Pin DO-219AB T/R", Octopart=https://octopart.com/bzd27c5v6p-e3-08-vishay-30317385, RoHS=TRUE, Standoff Height=0mm, Temperature Range High=+175°C, Zener Impedance=2Ω
D3: library part CMP-1426-00007-5, "WURTH ELEKTRONIK - 150080GS75000 - LED, Green, SMD, 0805, 30 mA, 3.2 V, 520 nm", Case Code (Imperial)=0805, Case Code (Metric)=2012, Color=Green, Forward Current=100mA, Forward Voltage=3.2V, Manufacturer Lifecycle Status=ACTIVE, Manufacturer Package Identifier="0805 (2012 metric)", Max Junction Temperature (Tj)=95°C, Max Operating Temperature=85°C, Max Reverse Voltage (DC)=5V, Min Operating Temperature=-40°C, Power Dissipation=105mW, Test Current=20mA, Case/Package=0805, Dominant Wavelength=525nm, Height=700µm, Length=2mm, Lens Style="Clear, Rectangular", Lifecycle Status=Production, Luminous Intensity=450mcd, Mount="Surface Mount", Packaging="Tape and Reel", Peak Wavelength=515nm, REACH SVHC=Unknown, Reverse Voltage=5V, RoHS=Compliant, Viewing Angle=140°, Wavelength=525nm, Width=1.25mm, YEOL="1 = Estimated lifetime > 10 years"
D4: library part CMP-1426-00008-9, "Wurth Elektronik Blue LED, WL-SMCW Series, 0805 (2012), 470nm, 2x1.25x0.7mm", Case Code (Imperial)=0805, Case Code (Metric)=2012, Color=Blue, Forward Current=100mA, Forward Voltage=3.2V, Manufacturer Lifecycle Status=ACTIVE, Manufacturer Package Identifier="0805 (2012 metric)", Max Junction Temperature (Tj)=95°C, Max Operating Temperature=85°C, Max Reverse Voltage (DC)=5V, Min Operating Temperature=-40°C, Power Dissipation=105mW, Test Current=20mA, Case/Package=0805, Dominant Wavelength=470nm, Height=700µm, Lead Free="Lead Free", Length=2mm, Lens Style="Clear, Rectangular", Lifecycle Status=Production, Luminous Intensity=145mcd, Mount="Surface Mount", Packaging="Tape and Reel", Peak Wavelength=465nm, REACH SVHC=Unknown, Reverse Voltage=5V, RoHS=Compliant, Viewing Angle=140°, Wavelength=470nm, Width=1.25mm, YEOL="1 = Estimated lifetime > 10 years"
D5: library part CMP-12792-000028-1, "DIODE ZENER 2.4V 200MW SOD323", Max Operating Temperature=150°C, Max Power Dissipation=200mW, Max Reverse Leakage Current=50uA, Min Operating Temperature=-65°C, Output Current=50mA, Package Quantity=3000, Test Current=5mA, Tolerance=8%, Contact Plating=Tin, Element Configuration=Single, ESD Protection=No, Height=1mm, Impedance=100R, Lead Free="Lead Free", Length=1.8mm, Mount="Surface Mount", Number of Pins=2, Packaging="Tape and Reel", Peak Reverse Current=50uA, Power Dissipation=200mW, Power Rating=200mW, Radiation Hardening=No, REACH SVHC="No SVHC", Termination=SMD/SMT, Voltage Rating (DC)=2.4V, Voltage Tolerance=8%, Weight=0.000173oz, Width=1.4mm, Zener Current=5mA, Zener Voltage=2.4V
D6: library part CMP-12828-000026-1, "TVS DIODE 22V 37V SOD323", Clamping Voltage=37V, Max Operating Temperature=125°C, Min Breakdown Voltage=24V, Min Operating Temperature=-55°C, Peak Pulse Current=30A, Peak Pulse Power=1kW, Power Line Protection=No, Reverse Standoff Voltage=22V, Composition=Zener, Mount="Surface Mount", Number of Unidirectional Channels=1, Packaging="Tape and Reel"
J1: library part CMP-2000-05627-1, "Jack BNC Connector, 1 Position, Height 16.26 mm, Tail Length 6.35 mm, -55 to 85 degC, RoHS, Tube", Frequency - Max=4GHz, Manufacturer="TE Connectivity", Package Description="Jack BNC Connector, 1 Position, Height 16.26 mm, Tail Length 6.35 mm", Standard Package=30, 3D Model=5227699-2.pdf, Category=Connectors,Interconnects, Connector Style=BNC, Connector Type=Jack,FemaleSockets, Contact Termination=Solder, Datasheet URL=http://www.te.com/commerce/DocumentDelivery/DDEController?Action=showdoc&DocId=Customer+Drawing%7F5227699%7FA1%7Fpdf%7FEnglish%7FENG_CD_5227699_A1.pdf%7F5227699-2, Datasheet Version="Rev. A1, 03/2011", Dynamic Catalog=BNCConnectors, Family=CoaxialConnectors(RF), Fastening Type=BayonetLock, Impedance=50Ohm, Manufacturer URL=http://www.te.com/, Mounting Technology=ThroughHole, Mounting Type=ThroughHole,Flange(Square), Other Names=A32269, Package Reference=5227699-2, Packaging=Bulk, RoHS Information=5227699-2StatementofCompliance, Series=BNC
J2: library part CMP-2000-05649-1, "Banana Jack, Non-Insulated, 1-Pin THD, RoHS, Bulk", Color=-, Manufacturer=Keystone-Electronics, Package Description="1-Pin Through Hole Device, Dia 7.92 mm", Package Version="Rev. B, 11/1994", Body Material=-, Category=Connectors,Interconnects, Contact Finish=Nickel, Contact Material=Brass, Datasheet URL=http://www.keyelco.com/product-pdf.cfm?p=2379, Datasheet Version="Rev. B, 11/1994", Family=BananaandTipConnectors-Jacks,Plugs, Features=-, Gender=Female, Insulation=Non-Insulated, Manufacturer URL=http://www.keyelco.com/, Mounting Technology=ThroughHole, Mounting Type=ThroughHole, Operating Temperature=-, Package Reference=575-4, Package URL=http://www.keyelco.com/product-pdf.cfm?p=2379, Packaging=Bulk, Plug/Mating Plug Diameter=StandardBanana, Series=-, Termination=Solder, Type=BananaJack, Wire Gauge=-
P1: library part CMP-1502-00342-3, "Header, 3.00MM, SMT Male Dual Row Vertical, SMT Solder Tab, SMT, Tin, 6 Pins", Color=Black, Contact Resistance=10mΩ, Current Rating=5A, Insulation Resistance=1GΩ, Max Operating Temperature=105°C, Min Operating Temperature=-40°C, Operating Supply Voltage=250V, Connector Type="Male Pin, Socket", Contact Material=Copper, Contact Plating=Tin, Fastening Type=Ramp, Gender=Male, Height=9.9mm, Housing Material=Nylon, Lead Pitch=3mm, Length=12.7mm, Mount="Surface Mount", Number of Contacts=6, Number of Pins=6, Number of Positions=6, Number of Rows=2, Orientation=Vertical, Pitch=3mm, RoHS=Compliant, Row Spacing=2.9972mm, Termination=Solder, Width=12.7mm
R1: library part CMP-2002-00036-1, Manufacturer="Vishay Dale", Part Number=CRCW0402499KFKTD
R2 R3 R5 R6: library part CMP-2100-03671-1, "Chip Resistor, 1 KOhm, +/- 1%, 125 mW, -55 to 155 degC, 0805 (2012 Metric), RoHS, Tape and Reel", Case Code (Imperial)=0805, Case Code (Metric)=2012, Manufacturer=Yageo, Max Operating Temperature=155degC, Max Power Dissipation=125mW, Min Operating Temperature=-55degC, Package Description="2-Pin Surface Mounted Device, Body 2 x 1.25 mm", Package Quantity=1, Resistance=1KOhm, Temperature Coefficient=100ppm/degreesC, Tolerance=1%, Voltage Rating=150V, Case/Package=0805, Composition=ThickFilm, Datasheet URL=http://www.yageo.com/NewPortal/yageodocoutput?fileName=/pdf/R-Chip/PYu-RC_Group_51_RoHS_L_5.pdf, Datasheet Version="Rev. 5, 10/2016", Depth=1.25mm, Height=0.024inch, Lead Free=LeadFree, Length=0.079inch, Manufacturer URL=http://www.yageo.com/, Military Standard=Not, Number of Pins=2, Number of Terminations=2, Package Reference=0805, Packaging=TapeandReel, Power Rating=125mW, REACH SVHC=Unknown, RoHSCompliant=true, Termination=SMD/SMT, Voltage Rating (DC)=150V, Width=0.049inch
R4: library part CMP-1011-00001-2, Manufacturer="Yageo / Phycomp", Part Number=RC0402JR-070RL
R7 R8 R13 R15 R16: library part CMP-2002-08357-1, Manufacturer="Vishay Dale", Part Number=CRCW040220K0FKTD
R9: library part CMP-00621-71392720-1, "RT0402BRE0750RL Fixed Resistor, Thin Film, 0.0625W, 50ohm, 50V, 0.1% +/-Tol, 50ppm/Cel, Surface Mount, 0402", Case/Package=0402, Max Operating Temperature=155°C, Max Power Dissipation=63mW, Min Operating Temperature=-55°C, Resistance=50Ω, Temperature Coefficient=50ppm/°C, Tolerance=0.1%, Composition="Thin Film", Features="Moisture Resistant", Height=355.6µm, Length=990.6µm, NexarPartId=71392720, Number of Terminations=2, Packaging="Tape & Reel", RoHS=Compliant, Width=508µm
R10 R12: library part CMP-2002-04584-1, Manufacturer="KOA Speer", Part Number=SG73P1ETTP1002F
R11: library part CMP-250906-269177-1, "RES Thin Film,  10Ω, 0.5%, 0.1W, 50ppm/°C, 0603"
R14: library part CMP-04015-046155-1, "1.8kΩ ±0.1% 0.063W, 1/16W Chip Resistor 0402 (1005 Metric) Moisture Resistant Thin Film"
SW1 SW2: library part CMP-10038-000009-1, "SWITCH SLIDE DPDT 300MA 6V", Current Rating=300mA, Max Operating Temperature=85°C, Min Operating Temperature=-40°C, Voltage Rating (DC)=6V, Actuator Length=2mm, Actuator Material=Nylon, Actuator Type=Standard, Contact Material="Copper Alloy", Contact Plating=Silver, Electrical Life=5000Cycles, Mount="Surface Mount", Packaging="Cut Tape", Switch Function=On-On, Switch Travel=2mm, Throw Configuration=DPDT
TP1: library part CMP-1672-00008-3, "Phosphor Bronze Contact Miniature Silver Plated Surface Mount Test Points", China RoHS=Compliant, ComponentLink1Description="Manufacturer's Website", ComponentLink1URL=http://www.keyelco.com/, ComponentLink2Description="Datasheet URL", ComponentLink2URL=https://www.keyelco.com/product-pdf.cfm?p=1357, Contact Material=Silver, Contact Plating=Silver, Height=2.42mm, HelpURL=https://www.keyelco.com/product-pdf.cfm?p=1357, Lead Free="Lead Free", Lifecycle Status=Production, Material=Bronze, Mount="Surface Mount", Number of Contacts=1, Number of Pins=1, Packaging="Tape and Reel", REACH SVHC=Yes, RoHS=Compliant, Termination=SMD/SMT
U1: library part CMP-09138-000053-1, "IC REG LINEAR 0V 500MA 12MSOP", Case/Package=MSOP, RoHS Compliant=Yes
U2: "High-speed, voltage-controlled current output driver 13-WQFN-HR -40 to 125", Manufacturer_Name="Texas Instruments", Copyright="Copyright (C) 2025 Ultra Librarian. All rights reserved.", Manufacturer_Part_Number=LMH13000RQER, RefDes=RefDes, Type=Type
U3: library part CMP-04861-000027-1, "10-Bit and 8-Bit, Voltage-Output Smart DACs With Nonvolatile Memory and PMBus™ Compatible I2C Interface With GPI Control", RoHS Compliant=Yes

## Via types
v1: diameter 0.61, hole 0.3, Top Layer 1 to Bottom Layer 1, tented top, 323 vias
v2: diameter 0.508, hole 0.2, Top Layer 1 to Bottom Layer 1, tented top, 6 vias
v3: diameter 0.8, hole 0.3, Top Layer 1 to Bottom Layer 1, tented top, 4 vias
v4: diameter 4, hole 3, Top Layer 1 to Bottom Layer 1, 4 vias
v5: diameter 1.1, hole 0.7, Top Layer 1 to Bottom Layer 1, 3 vias

## Nets (pads, with @x,y where several pads share a name; then routed paths per layer and width w, separated by ;. In a path a pad name is that pad's centre, name@x,y a point inside that pad or via, vN(x,y) a via of type N, cw(c..) or ccw(c..) an arc to the next point about the centre after c; other vN are vias at no path point)
+3V3: P1.5 R15.2 R16.2 | length 43
  Top Layer 1 w0.254: P1.5 26.718,-40.518 23.792,-37.592 ; R16.2 30.874,-31.488 28.727,-33.635 28.727,-35.45 26.586,-37.592 23.792,-37.592 ; R15.2 27.543,-27.956 22.776,-32.723 22.776,-36.576 23.792,-37.592
+5V0: C4.2 C5.2 C6.1 C7.1 C9.1 D2.2 P1.4 R4.2 R8.2 SW1.2 SW2.1 SW2.6 U2.4 U2.5 U2.13 U3.6 | length 38.5
  Top Layer 1 w0.254: v2(23.749,-18.923) 25.821,-18.923 SW1.2@26.035,-18.709 ; 37.211,-23.304 37.777,-22.739 ; C4.2 37.777,-22.167 37.777,-22.739 ; C4.2@37.973,-21.971 38.401,-21.543 ; C7.1 38.895,-22.073 38.401,-21.579 38.401,-21.543 ; C6.1 38.805,-23.7 38.374,-23.7 38.169,-23.495 v2(38.1,-23.495) 38.051,-23.446 38.051,-23.014 37.777,-22.739 ; U2.5 U2.4 38.829,-20.599 38.829,-21.115 38.401,-21.543 ; U3.6 40.052,-29.841 ; 40.283,-30.104 40.437,-29.949 C9.1
  Top Layer 1 w0.381: 36.753,-17.67 U2.13@37.308,-17.67
  Top Layer 1 w0.508: SW2.1@18.923,-16.169 19.558,-16.169 SW2.1@19.914,-16.169 ; SW2.1@19.558,-16.29 19.793,-16.29 SW2.1@19.914,-16.169 ; SW2.1@20.131,-16.169 SW2.1@19.914,-16.169 ; SW2.6@21.323,-18.669 SW2.6@21.958,-18.669 ; SW2.6 23.622,-18.796 v2(23.749,-18.923) ; R4.2@23.239,-10.054 24.204,-10.054 24.21,-10.059 24.21,-10.48 23.749,-10.941 23.749,-11.176 20.574,-14.351 v2(20.574,-15.274) 20.033,-15.815 20.033,-16.05 SW2.1@19.914,-16.169 ; v2(23.266,-40.335) 23.286,-40.355 23.286,-40.863 23.647,-41.224 P1.4@23.647,-43.806 ; 24.204,-9.906 25.093,-9.017 D2.2@25.093,-7.747 ; v2(35.814,-18.542) 35.881,-18.542 36.753,-17.67 ; v2(35.814,-14.097) 36.076,-14.097 R8.2 ; 37.211,-23.304 37.211,-24.328 37.812,-24.929 37.812,-25.239 38.481,-25.908 C5.2 ; 40.052,-29.841 40.052,-29.873 40.283,-30.104 40.513,-30.334 40.513,-31.623 v3(40.132,-32.004)
GND: C1.2 C2.2 C3.1 C4.1 C5.1 C6.2 C7.2 C8.2 C9.2 C10.1 C11.1 C12.2 D1.1 D2.1 D3.1 D4.1 D5.2 J1.2 J1.3 J1.4 J1.5 P1.6 R1.1 R2.2 R7.1 R9.1 R10.1 R12.1 R14.1 SW1.5 U1.6 U1.9 U1.13 U2.3 U2.6 U2.9 U2.12 U3.1 U3.5 U3.9 | length 11.4
  Top Layer 1 w0.254: v3(35.052,-17.507) 35.2,-17.507 35.611,-17.095 37.601,-17.095 37.735,-17.229 37.735,-17.357 37.829,-17.451 37.829,-17.599 U2.12 ; R9.1@36.11,-15.909 R9.1 ; v3(37.335,-35.309) 37.335,-35.438 38.346,-36.449 R14.1 ; U2.3 U2.6 ; C11.1 41.185,-26.522 41.562,-26.899 C10.1 ; U1.9 42.347,-14.161 C3.1 42.639,-14.503 42.639,-15.85 R1.1
  other v1: 6.6,-45 10.6,-45 14.6,-45 18.6,-45 20.6,-45 32.6,-45 34.6,-45 36.6,-45 38.6,-45 40.6,-45 42.6,-45 44.6,-45 46.6,-45 48.6,-45 52.6,-45 7.6,-43 17.6,-43 19.6,-43 21.6,-43 31.6,-43 33.6,-43 35.6,-43 37.6,-43 39.6,-43 41.6,-43 43.6,-43 45.6,-43 0.6,-41 6.6,-41 10.6,-41 14.6,-41 24.6,-41 28.6,-41 30.6,-41 36.6,-41 38.6,-41 40.6,-41 42.6,-41 44.6,-41 46.6,-41 52.6,-41 1.6,-39 3.6,-39 5.6,-39 7.6,-39 23.6,-39 27.6,-39 29.6,-39 37.6,-39 39.6,-39 41.6,-39 43.6,-39 45.6,-39 47.6,-39 49.6,-39 51.6,-39 0.6,-37 2.6,-37 4.6,-37 6.6,-37 14.6,-37 18.6,-37 20.6,-37 28.6,-37 32.6,-37 34.6,-37 36.6,-37 40.6,-37 44.6,-37 46.6,-37 48.6,-37 50.6,-37 52.6,-37 1.6,-35 3.6,-35 5.6,-35 7.6,-35 9.6,-35 11.6,-35 15.6,-35 17.6,-35 19.6,-35 21.6,-35 31.6,-35 33.6,-35 35.6,-35 41.6,-35 45.6,-35 47.6,-35 49.6,-35 51.6,-35 0.6,-33 2.6,-33 4.6,-33 6.6,-33 8.6,-33 10.6,-33 12.6,-33 20.6,-33 30.6,-33 32.6,-33 34.6,-33 38.6,-33 44.6,-33 46.6,-33 48.6,-33 50.6,-33 52.6,-33 1.6,-31 3.6,-31 5.6,-31 7.6,-31 9.6,-31 11.6,-31 13.6,-31 15.6,-31 21.6,-31 45.6,-31 47.6,-31 49.6,-31 51.6,-31 4.6,-29 6.6,-29 8.6,-29 10.6,-29 16.6,-29 24.6,-29 44.6,-29 46.6,-29 48.6,-29 50.6,-29 52.6,-29 3.6,-27 5.6,-27 7.6,-27 9.6,-27 11.6,-27 15.6,-27 17.6,-27 19.6,-27 25.6,-27 27.6,-27 29.6,-27 31.6,-27 33.6,-27 35.6,-27 47.6,-27 49.6,-27 51.6,-27 0.6,-25 2.6,-25 4.6,-25 6.6,-25 8.6,-25 10.6,-25 12.6,-25 14.6,-25 16.6,-25 18.6,-25 24.6,-25 26.6,-25 28.6,-25 30.6,-25 34.6,-25 44.6,-25 48.6,-25 50.6,-25 52.6,-25 1.6,-23 3.6,-23 5.6,-23 9.6,-23 11.6,-23 15.6,-23 17.6,-23 19.6,-23 23.6,-23 27.6,-23 29.6,-23 33.6,-23 47.6,-23 51.6,-23 0.6,-21 2.6,-21 4.6,-21 30.6,-21 40.6,-21 44.6,-21 50.6,-21 52.6,-21 1.6,-19 3.6,-19 5.6,-19 7.6,-19 9.6,-19 11.6,-19 13.6,-19 15.6,-19 17.6,-19 33.6,-19 51.6,-19 2.6,-17 4.6,-17 6.6,-17 8.6,-17 10.6,-17 14.6,-17 16.6,-17 30.6,-17 40.6,-17 42.6,-17 44.6,-17 46.6,-17 50.6,-17 52.6,-17 3.6,-15 5.6,-15 7.6,-15 9.6,-15 11.6,-15 17.6,-15 19.6,-15 21.6,-15 23.6,-15 27.6,-15 29.6,-15 31.6,-15 33.6,-15 35.6,-15 49.6,-15 51.6,-15 0.6,-13 2.6,-13 4.6,-13 6.6,-13 8.6,-13 10.6,-13 12.6,-13 14.6,-13 16.6,-13 18.6,-13 20.6,-13 24.6,-13 30.6,-13 32.6,-13 34.6,-13 36.6,-13 50.6,-13 52.6,-13 1.6,-11 3.6,-11 5.6,-11 7.6,-11 9.6,-11 11.6,-11 19.6,-11 21.6,-11 25.6,-11 27.6,-11 29.6,-11 31.6,-11 33.6,-11 35.6,-11 37.6,-11 45.6,-11 49.6,-11 51.6,-11 0.6,-9 2.6,-9 4.6,-9 6.6,-9 8.6,-9 10.6,-9 30.6,-9 32.6,-9 34.6,-9 36.6,-9 50.6,-9 52.6,-9 1.6,-7 3.6,-7 5.6,-7 7.6,-7 9.6,-7 45.6,-7 47.6,-7 49.6,-7 51.6,-7 0.6,-5 6.6,-5 8.6,-5 22.6,-5 24.6,-5 26.6,-5 28.6,-5 30.6,-5 32.6,-5 34.6,-5 36.6,-5 38.6,-5 40.6,-5 42.6,-5 44.6,-5 46.6,-5 52.6,-5 1.6,-3 7.6,-3 9.6,-3 11.6,-3 21.6,-3 23.6,-3 25.6,-3 27.6,-3 29.6,-3 31.6,-3 33.6,-3 35.6,-3 37.6,-3 39.6,-3 41.6,-3 43.6,-3 45.6,-3 47.6,-3
  other v3: 37.031,-25.253
  other v4: 3.937,-42.926 50.038,-42.926 4.064,-4.064 50.038,-4.064
IOUT: D6.1 R11.1 U2.7 U2.8 | length 18.7
  Top Layer 1 w0.254: R11.1 33.697,-20.761 34.366,-20.091 35.38,-20.091 36.373,-19.099 U2.7 ; 41.402,-19.099 41.91,-19.607 D6.1 ; v5@46.516,-19.212 46.86,-19.212 46.973,-19.099 v5(47.022,-19.05)
  Top Layer 1 w0.508: U2.8 U2.7 41.402,-19.099 v5@46.973,-19.099 ; v5@46.862,-19.05 v5(47.022,-19.05)
LASER_CTRL: R9.2 SW1.6 U2.11 | length 12.6
  Top Layer 1 w0.254: R9.2 37.203,-16.052 37.773,-16.622 37.773,-16.68
  Top Layer 1 w0.374: SW1.6 30.948,-18.836 33.104,-16.68 37.773,-16.68 38.319,-17.226 38.319,-17.589 U2.11
NetC3_2: C3.2 R1.2 U1.8 | length 3.4
  Top Layer 1 w0.254: U1.8 41.68,-12.54 41.68,-14.461 C3.2 41.689,-14.503 41.689,-15.85 R1.2
NetC8_1: C8.1 R11.2 | length 1.4
  Top Layer 1 w0.508: C8.1 R11.2@32.258,-22.457
NetC12_1: C12.1 U3.4 | length 1.4
  Top Layer 1 w0.254: C12.1 37.478,-30.495 37.605,-30.368 U3.4
NetD1_2: D1.2 R3.2 | length 3.3
  Top Layer 1 w0.254: D1.2@15.875,-42.384 16.002,-42.257 R3.2
NetD3_2: D3.2 R5.2 | length 3.4
  Top Layer 1 w0.254: R5.2 9.144,-42.13 D3.2@9.398,-42.384
NetD4_2: D4.2 R6.2 | length 3.2
  Top Layer 1 w0.254: D4.2@12.573,-42.35 R6.2
NetR2_1: R2.1 SW1.1 | length 3.7
  Top Layer 1 w0.254: SW1.1 25.781,-14.097 26.051,-13.827 R2.1
NetR3_1: R3.1 SW1.3 | length 19.9
  Top Layer 1 w0.254: R3.1 16.072,-37.1 16.545,-36.627 16.545,-34.255 25.781,-25.019 SW1.3
NetR5_1: R5.1 SW2.5 | length 30.7
  Top Layer 1 w0.254: R5.1 10.652,-37.1 20.929,-26.823 20.929,-21.044 19.931,-20.046 19.185,-20.046 18.529,-19.391 18.529,-18.201 18.663,-18.067 19.554,-17.177 21.809,-17.177 21.958,-17.028 SW2.5
NetR6_1: R6.1 SW2.7 | length 19.7
  Top Layer 1 w0.254: R6.1 12.754,-36.919 12.754,-36.268 21.958,-27.064 SW2.7
NetR7_2: R7.2 U2.1 | length 2.5
  Top Layer 1 w0.254: R7.2 35.187,-20.574 U2.1
NetR8_1: R8.1 R10.2 U2.10 | length 4.7
  Top Layer 1 w0.254: R10.2@37.838,-13.376 37.838,-16.002 38.854,-17.018 U2.10
NetR13_1: R13.1 U3.7 U3.8 | length 2
  Top Layer 1 w0.254: U3.7 U3.8 40.899,-28.841 R13.1
NetSW1_7: SW1.7 SW2.2 | length 9.7
  Top Layer 1 w0.374: SW2.2 20.736,-19.974 25.054,-19.974 25.4,-20.32 26.865,-20.32 27.881,-21.336 SW1.7
"PD READ": P1.3 R12.2 | length 36.5
  Top Layer 1 w0.254: P1.3 29.718,-36.576 31.369,-38.227 41.529,-38.227 43.307,-36.449 43.307,-28.067 44.23,-27.144 44.623,-27.144 44.623,-27.119 49.022,-22.72 v5(49.022,-19.05)
PULSE: J1.1 SW2.3 | length 12.7
  Top Layer 1 w0.254: J1.1 12.954,-21.717 13.716,-22.479
  Top Layer 1 w0.374: 13.716,-22.479 14.224,-22.479 15.621,-21.082 19.344,-21.082 SW2.3
REF_OUT: D5.1 R13.2 R14.2 U2.2 | length 22.5
  Top Layer 1 w0.254: U2.2 37.854,-20.722 37.735,-20.841 37.735,-20.969 37.284,-21.42 36.881,-21.42 35.56,-22.741 35.56,-24.892 38.049,-27.381 39.573,-27.381 40.132,-27.94 41.284,-27.94 R13.2 42.042,-32.276 D5.1@39.905,-34.413 ; R14.2 39.182,-34.502 39.271,-34.413 D5.1
SCL: P1.1 R15.1 U3.2 | length 16.6
  Top Layer 1 w0.254: P1.1@23.718,-34.734 23.718,-34.417 29.179,-28.956 R15.1 36.249,-28.956 36.634,-29.341 U3.2
SDA: P1.2 R16.1 U3.3 | length 13.7
  Top Layer 1 w0.254: P1.2 27.029,-34.741 27.029,-33.55 30.091,-30.488 R16.1 35.953,-29.841 U3.3
V_EXT: C1.1 J2.1 R4.1 U1.1 U1.2 U1.3 U1.4 U1.7 | length 46.1
  Top Layer 1 w0.254: C1.1 40.716,-13.343 41.047,-13.012 U1.7
  Top Layer 1 w0.508: J2.1 J2.1@17.055,-6.731 ; R4.1 20.357,-10.033 J2.1@17.055,-6.731 ; U1.7 41.047,-12.034 41.02,-12.008 40.837,-12.008 37.084,-8.255 37.084,-6.731 ; U1.1 U1.2 U1.3 U1.4 42.32,-8.278 42.32,-7.56 41.491,-6.731 37.084,-6.731 ; J2.1@17.055,-6.731 37.084,-6.731
VBIAS: C2.1 C10.2 C11.2 D6.2 TP1.1 U1.10 U1.11 U1.12 | length 29.5
  Top Layer 1 w0.254: D6.2 41.91,-24.271 C11.2@42.635,-24.996 ; C10.2 42.512,-25.269 C11.2 C11.2@42.635,-24.996 ; TP1.1 48.022,-10.938 v5(48.022,-18.05) 48.022,-19.609 C11.2@42.635,-24.996
  Top Layer 1 w0.508: U1.10 U1.11 ; C2.1 44.069,-15.038 43.647,-14.616 U1.11 ; TP1.1 47.879,-11.68 47.035,-12.524 U1.12 U1.11
pads on no net: P1.MP1 P1.MP2 U1.5

## Polygon pours and split planes (outlines as drawn)
GND on GND "GND_L02_P000" (solid, remove dead copper, pour order 0): -1.524,-43.958 -1.524,-2.524 1,0 52.721,0 55.118,-2.397 55.118,-44.085 52.721,-46.482 1,-46.482
GND on Top Layer 1 "GND_L01_P002" (solid, remove dead copper, pour order 2): -1.524,-43.41 -1.524,-2.574 1.037,-0.013 52.758,-0.013 55.118,-2.373 55.118,-44.134 53.139,-46.114 1.18,-46.114
+5V0 on 5V0 "+5V0_L03_P001" (solid, remove dead copper, pour order 1): -1.524,-43.958 -1.524,-2.524 1,0 52.721,0 55.118,-2.397 55.118,-44.085 52.721,-46.482 1,-46.482

## Silkscreen, mask and mechanical layers (free items; w line width, h text height)
Top Overlay:
  drawing of 71 lines, arcs and shapes, not listed
  text "Scan for a good time ;)" at 24.13,-2.747 h1.52
  text "VBias TP" at 50.249,-12.954 h1.52 r90
  text "CW" at 18.415,-15.748 h1.52 r90
  text "OFF" at 24.511,-16.256 h1.52 r90
  text "Ø5.6 mm A PIN DIODE only" at 54.102,-22.081 h1.52 r90
  text "Pulse" at 18.415,-23.368 h1.52 r90
  text "ON" at 24.638,-23.368 h1.52 r90
  text "QKD-LD-002 / REV A / Engineer: AS" at 53.975,-37.973 h1.52 r90
  text "Laser Indicator LEDs" at 5.461,-39.37 h1.52 r90
  text "SCL" at 38.354,-40.513 h1.52 r90
  text "PD" at 44.831,-40.513 h1.52 r90
  text "SDA" at 41.402,-40.894 h1.52 r90
  text "5V" at 41.529,-43.434 h1.52 r90
  text "3V3" at 38.354,-43.688 h1.52 r90
  text "EN" at 14.859,-43.815 h1.52 r90
  text "GND" at 44.831,-43.942 h1.52 r90
  text "CW" at 7.747,-44.069 h1.52 r90
  text "Pulse" at 11.303,-44.196 h1.52 r90

## Text inside footprints (layer, text, board x,y; h text height)
U2: Top 3D Body "*" at 37.989,-19.804 h1.27 r90; Top Overlay "*" at 34.671,-19.812 h1.27 r90